# Altium PCB QSTL_QD4_2SET_38PAD.PcbDoc (part 1 of 2)
Units mm, origin at the board's own origin, x right, y up, seen from the top; angles counter-clockwise.
Board outline 32.6 x 99.03 mm, 6 copper layers (L1_GND, L2_DC_A, L3_DC_B, L4_GND, L5_GND, L6_RF_QD), stack 1.588 mm thick; 50 components, 71 nets, 241 pads, 1590 vias.
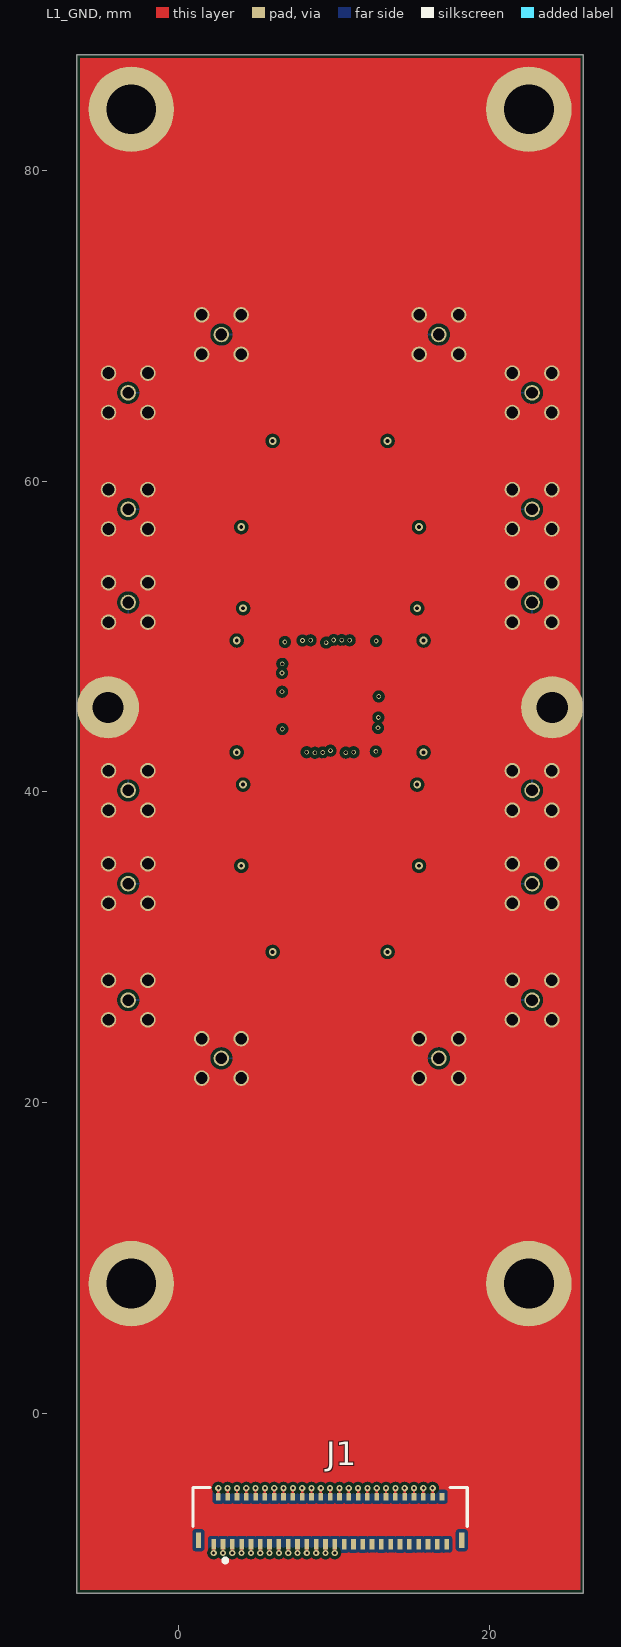
[diagram p0: L1_GND view]
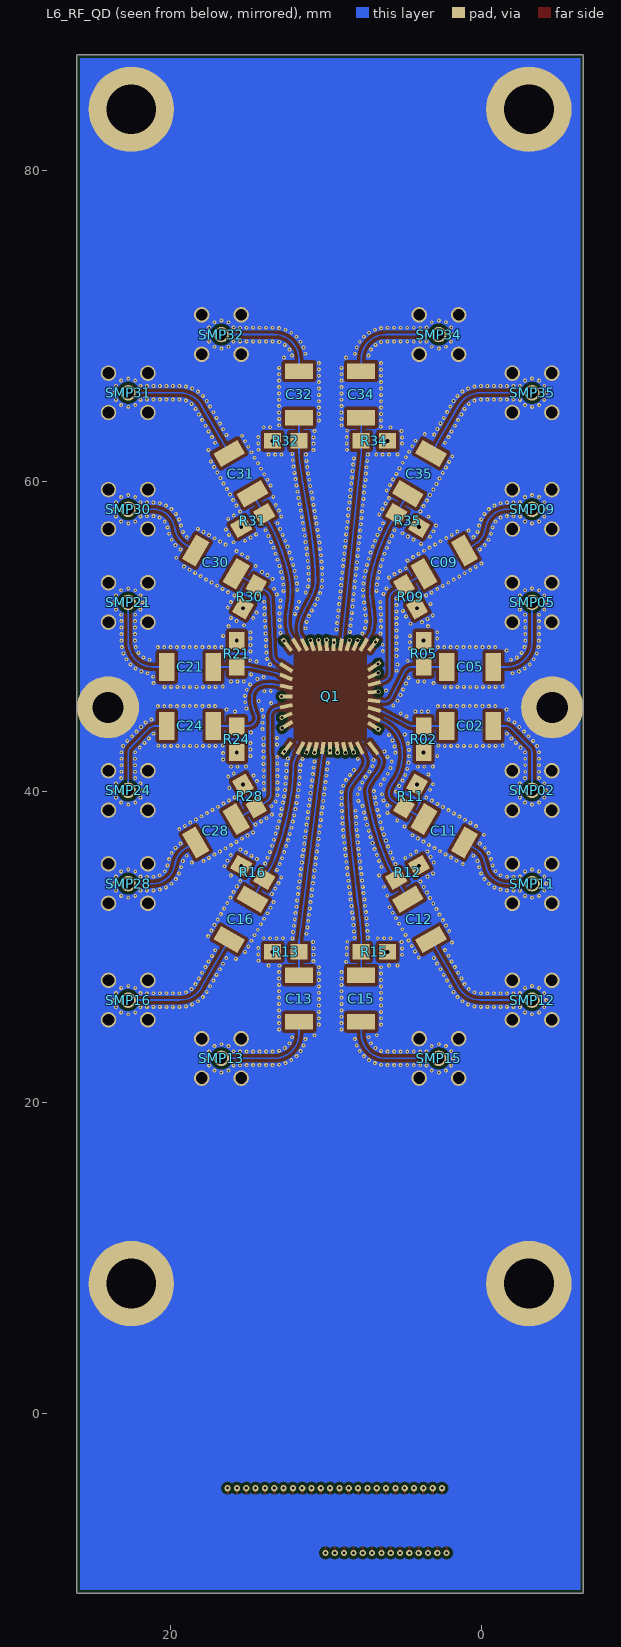
[diagram p1: L6_RF_QD view, seen from below]
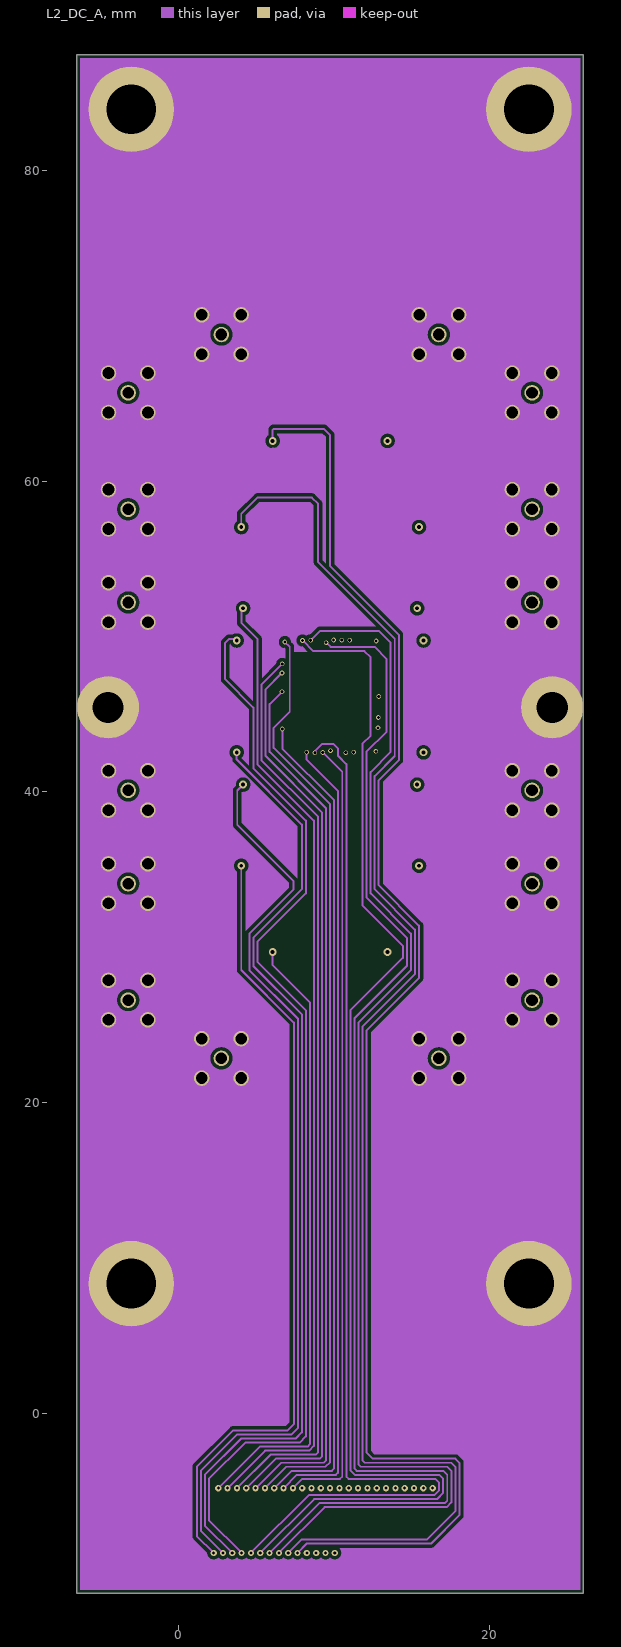
[diagram p2: L2_DC_A]
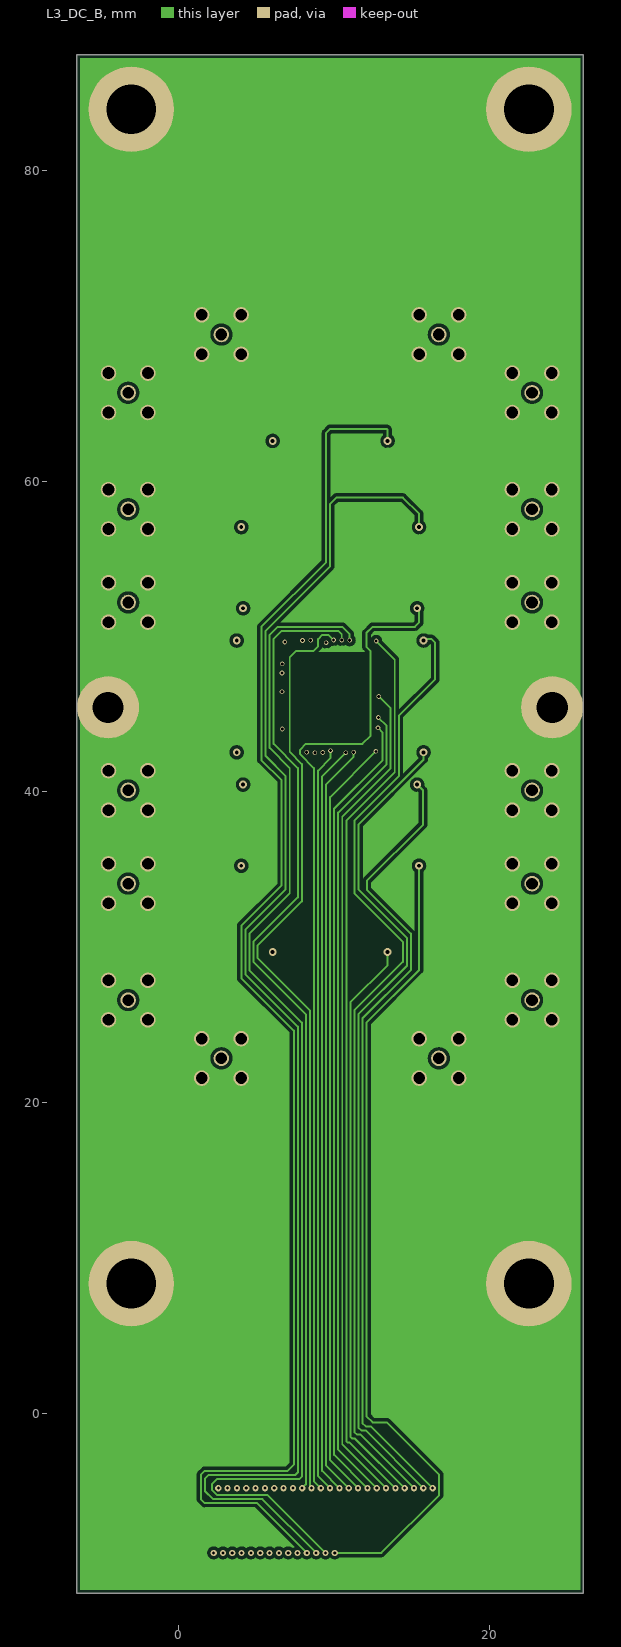
[diagram p3: L3_DC_B]
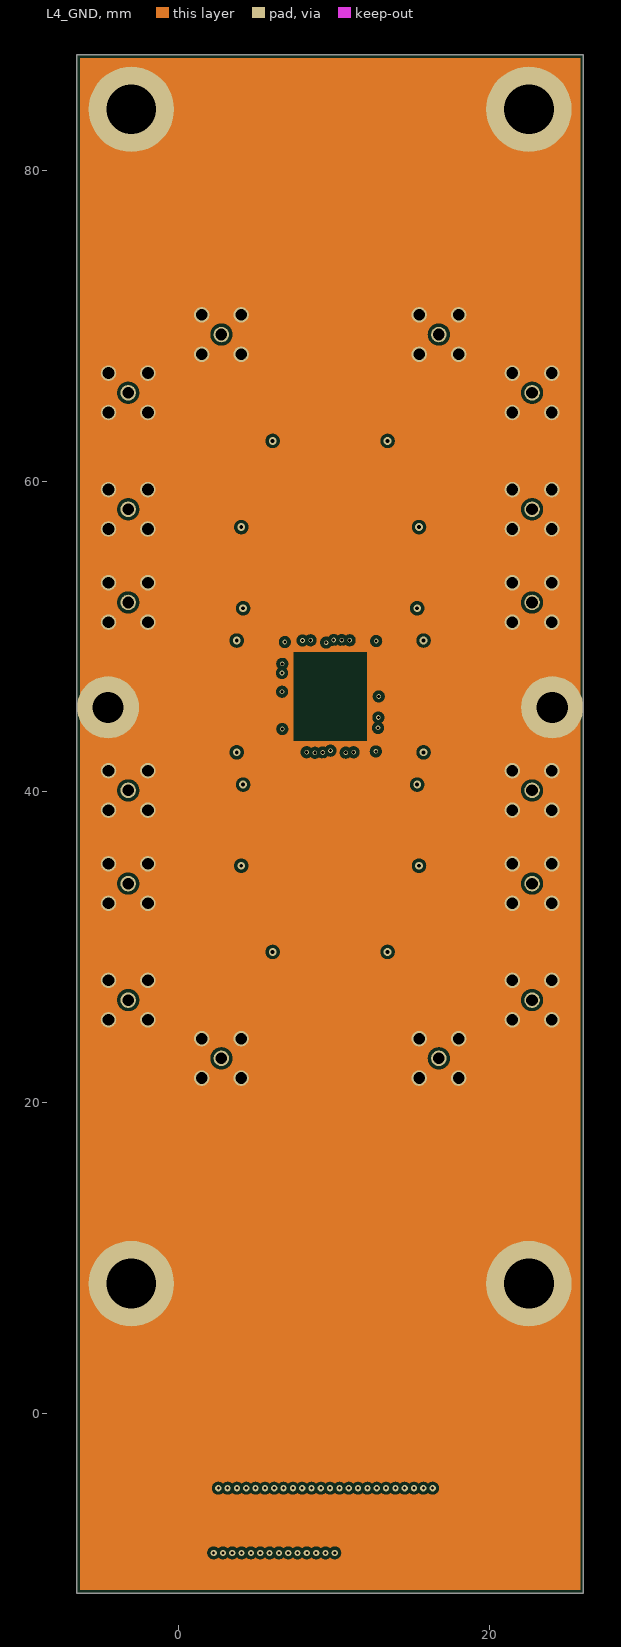
[diagram p4: L4_GND]
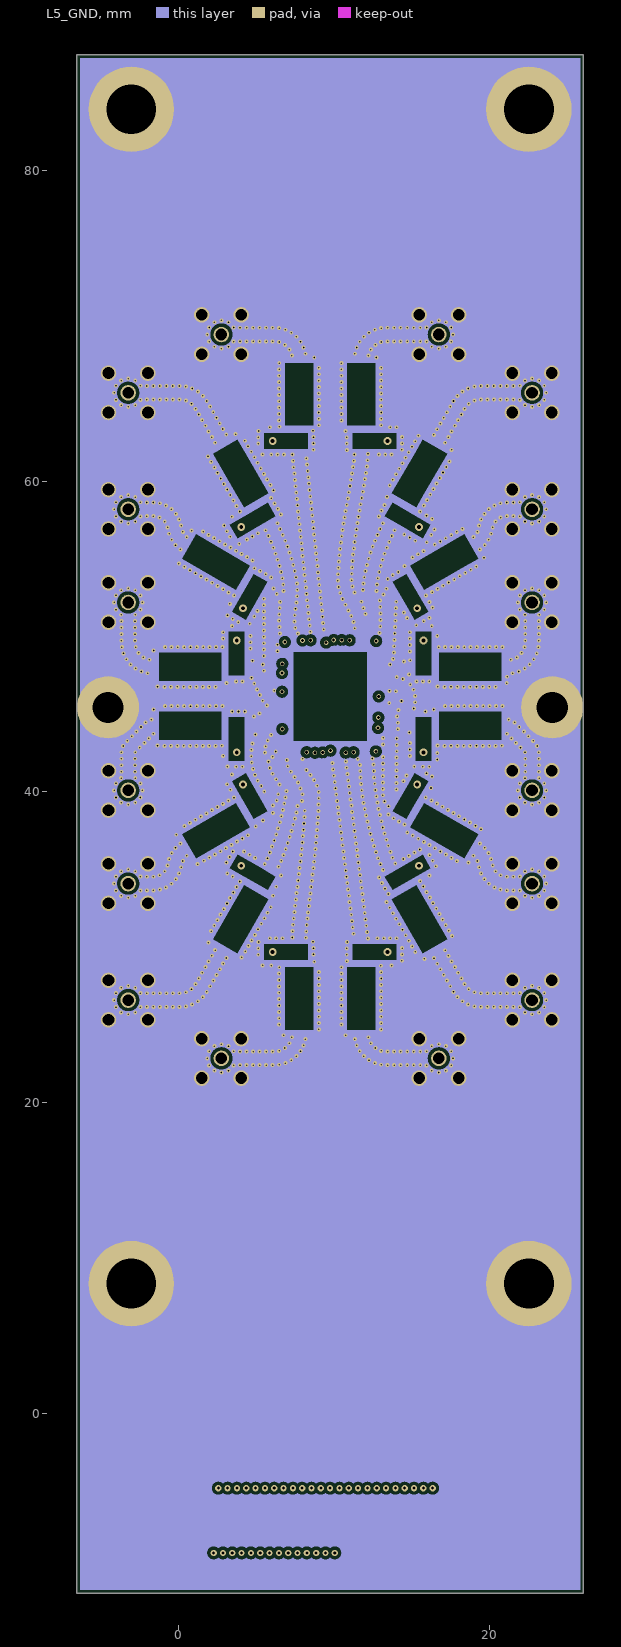
[diagram p5: L5_GND]
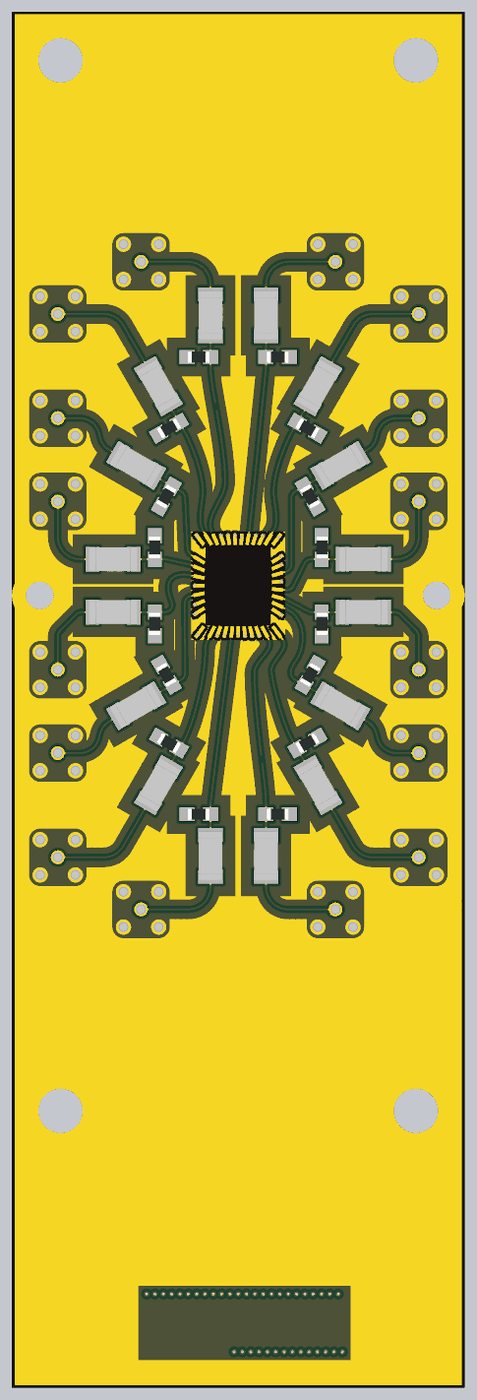
[diagram p7: 3D render of the assembled board from below, using the file's embedded part models]

## Layer stack, top to bottom
Top Solder: solder mask 0.0102, Solder Resist, Dk 3.5
L1_GND: signal copper 0.035
Dielectric 1: dielectric 0.0784, 1078RC69%, Dk 4.8
L2_DC_A: signal copper 0.0152
Dielectric2: dielectric 0.55, 0.55mm H/HOZ CORE, Dk 4.8
L3_DC_B: signal copper 0.0152
Dielectric3: dielectric 0.2008, 7628RC50%, Dk 4.8
L4_GND: signal copper 0.0152
Dielectric4: dielectric 0.55, 0.55mm H/HOZ CORE, Dk 4.8
L5_GND: signal copper 0.0152
Dielectric5: dielectric 0.0784, 1078RC69%, Dk 4.8
L6_RF_QD: signal copper 0.035
Bottom Solder: solder mask 0.0102, Solder Resist, Dk 3.5

## Board outline
-6.55,-11.575 26.05,-11.575 26.05,87.45 -6.55,87.45

## Design rules (kind name [scope] priority, off if disabled: settings)
Clearance QD38_DC_PAIR_GAP_0P1 [(InNet('DC01') Or InNet('DC02') Or InNet('DC03') Or InNet('DC04') Or InNet('DC05') Or InNet('DC06') Or InNet('DC07') Or InNet('DC08') Or InNet('DC09') Or InNet('DC10') Or InNet('DC11') Or InNet('DC12') Or InNet('DC13') Or InNet('DC14') Or InNet('DC15') Or InNet('DC16') Or InNet('DC17') Or InNet('DC18') Or InNet('DC19') Or InNet('DC20') Or InNet('DC21') Or InNet('DC22') Or InNet('DC23') Or InNet('DC24') Or InNet('DC25') Or InNet('DC26') Or InNet('DC27') Or InNet('DC28') Or InNet('DC29') Or InNet('DC30') Or InNet('DC31') Or InNet('DC32') Or InNet('DC33') Or InNet('DC34') Or InNet('DC35') Or InNet('DC36') Or InNet('DC37') Or InNet('DC38')) And (ExistsOnLayer('L2_DC_A') Or ExistsOnLayer('L3_DC_B')) vs (InNet('DC01') Or InNet('DC02') Or InNet('DC03') Or InNet('DC04') Or InNet('DC05') Or InNet('DC06') Or InNet('DC07') Or InNet('DC08') Or InNet('DC09') Or InNet('DC10') Or InNet('DC11') Or InNet('DC12') Or InNet('DC13') Or InNet('DC14') Or InNet('DC15') Or InNet('DC16') Or InNet('DC17') Or InNet('DC18') Or InNet('DC19') Or InNet('DC20') Or InNet('DC21') Or InNet('DC22') Or InNet('DC23') Or InNet('DC24') Or InNet('DC25') Or InNet('DC26') Or InNet('DC27') Or InNet('DC28') Or InNet('DC29') Or InNet('DC30') Or InNet('DC31') Or InNet('DC32') Or InNet('DC33') Or InNet('DC34') Or InNet('DC35') Or InNet('DC36') Or InNet('DC37') Or InNet('DC38')) And (ExistsOnLayer('L2_DC_A') Or ExistsOnLayer('L3_DC_B'))] p1: gap=0.1 ignorepadtopadclearanceinfootprint=FALSE
Clearance DC_GND_GAP_0P2 [InNet('GND') And (ExistsOnLayer('L2_DC_A') Or ExistsOnLayer('L3_DC_B')) vs (InNet('DC01') Or InNet('DC02') Or InNet('DC03') Or InNet('DC04') Or InNet('DC05') Or InNet('DC06') Or InNet('DC07') Or InNet('DC08') Or InNet('DC09') Or InNet('DC10') Or InNet('DC11') Or InNet('DC12') Or InNet('DC13') Or InNet('DC14') Or InNet('DC15') Or InNet('DC16') Or InNet('DC17') Or InNet('DC18') Or InNet('DC19') Or InNet('DC20') Or InNet('DC21') Or InNet('DC22') Or InNet('DC23') Or InNet('DC24') Or InNet('DC25') Or InNet('DC26') Or InNet('DC27') Or InNet('DC28') Or InNet('DC29') Or InNet('DC30') Or InNet('DC31') Or InNet('DC32') Or InNet('DC33') Or InNet('DC34') Or InNet('DC35') Or InNet('DC36') Or InNet('DC37') Or InNet('DC38')) And (ExistsOnLayer('L2_DC_A') Or ExistsOnLayer('L3_DC_B'))] p2: gap=0.2 ignorepadtopadclearanceinfootprint=FALSE // L2 and L4 GND pour clearance to signal copper: 0.20 mm.
Clearance RF_CPW_GND_GAP_0P2 [InNet('GND') And OnLayer('L6_RF_QD')] p3: gap=0.2 ignorepadtopadclearanceinfootprint=FALSE
Clearance [Not (InNet('GND') And OnLayer('L6_RF_QD')) And Not (InNet('GND') And (OnLayer('L2_DC_A') Or OnLayer('L3_DC_B'))) vs Not (InNet('GND') And OnLayer('L6_RF_QD')) And Not (InNet('GND') And (OnLayer('L2_DC_A') Or OnLayer('L3_DC_B')))] p4: gap=0.15 ignorepadtopadclearanceinfootprint=FALSE
HoleSize [All] p1: absolutevalues=TRUE maxlimit=4.1 minlimit=0.025 maxpercent=80.000 minpercent=20.000
MinimumSolderMaskSliver [All] p1: minsoldermaskwidth=0.1
PolygonConnect ZIF24V2_GND_VIA_SOLID [(IsVia Or (IsPad And Not InComponent('*'))) And InNet('GND')] p1: connectstyle=Direct reliefconductorwidth=0.254 reliefentries=4 polygonreliefangle="90 Angle" airgapwidth=0.254 // Solid GND shield vias and free mounting pads; component pads retain their rules.
PolygonConnect [All] p2: connectstyle=Relief reliefconductorwidth=0.254 reliefentries=4 polygonreliefangle="90 Angle" airgapwidth=0.254
RoutingLayers [All] p1: top layer_v5=TRUE mid layer 1_v5=TRUE mid layer 2_v5=TRUE mid layer 3_v5=FALSE mid layer 4_v5=FALSE bottom layer_v5=TRUE // RF on Bottom; DC on L2/L3 with short Top ZIF pad escapes. L1/L4/L5 GND.
RoutingVias QD38_QD_VIA_0P4_0P2 [IsVia And (InNet('DC01') Or InNet('DC03') Or InNet('DC04') Or InNet('DC06') Or InNet('DC07') Or InNet('DC08') Or InNet('DC10') Or InNet('DC14') Or InNet('DC17') Or InNet('DC18') Or InNet('DC19') Or InNet('DC20') Or InNet('DC22') Or InNet('DC23') Or InNet('DC25') Or InNet('DC26') Or InNet('DC27') Or InNet('DC29') Or InNet('DC33') Or InNet('DC36') Or InNet('DC37') Or InNet('DC38')) And InRegionAbsolute(251.927525197,1664.295451969,516.889710236,1969.719415748)] p1: holewidth=0.2 width=0.3 viastyle="Through Hole" minholewidth=0.2 minwidth=0.3 maxholewidth=0.2 maxwidth=0.3
RoutingVias QD38_ZIF_VIA_0P4_0P2 [IsVia And (InNet('DC01') Or InNet('DC02') Or InNet('DC03') Or InNet('DC04') Or InNet('DC05') Or InNet('DC06') Or InNet('DC07') Or InNet('DC08') Or InNet('DC09') Or InNet('DC10') Or InNet('DC11') Or InNet('DC12') Or InNet('DC13') Or InNet('DC14') Or InNet('DC15') Or InNet('DC16') Or InNet('DC17') Or InNet('DC18') Or InNet('DC19') Or InNet('DC20') Or InNet('DC21') Or InNet('DC22') Or InNet('DC23') Or InNet('DC24') Or InNet('DC25') Or InNet('DC26') Or InNet('DC27') Or InNet('DC28') Or InNet('DC29') Or InNet('DC30') Or InNet('DC31') Or InNet('DC32') Or InNet('DC33') Or InNet('DC34') Or InNet('DC35') Or InNet('DC36') Or InNet('DC37') Or InNet('DC38')) And InRegionAbsolute(78.740080315,-363.779481102,653.543219685,-180.118141732)] p2: holewidth=0.2 width=0.4 viastyle="Through Hole" minholewidth=0.2 minwidth=0.4 maxholewidth=0.2 maxwidth=0.4
RoutingVias RF_SHIELD_L5_L6 [IsVia And InNet('GND')] p3: holewidth=0.1 width=0.25 viastyle="Blind Buried (Adjacent Layers)" minholewidth=0.1 minwidth=0.25 maxholewidth=0.1 maxwidth=0.25
RoutingVias [Not (IsVia And InNet('GND')) And Not (IsVia And (InNet('DC01') Or InNet('DC02') Or InNet('DC03') Or InNet('DC04') Or InNet('DC05') Or InNet('DC06') Or InNet('DC07') Or InNet('DC08') Or InNet('DC09') Or InNet('DC10') Or InNet('DC11') Or InNet('DC12') Or InNet('DC13') Or InNet('DC14') Or InNet('DC15') Or InNet('DC16') Or InNet('DC17') Or InNet('DC18') Or InNet('DC19') Or InNet('DC20') Or InNet('DC21') Or InNet('DC22') Or InNet('DC23') Or InNet('DC24') Or InNet('DC25') Or InNet('DC26') Or InNet('DC27') Or InNet('DC28') Or InNet('DC29') Or InNet('DC30') Or InNet('DC31') Or InNet('DC32') Or InNet('DC33') Or InNet('DC34') Or InNet('DC35') Or InNet('DC36') Or InNet('DC37') Or InNet('DC38')) And InRegionAbsolute(78.740080315,-363.779481102,653.543219685,-180.118141732)) And Not (IsVia And (InNet('DC01') Or InNet('DC03') Or InNet('DC04') Or InNet('DC06') Or InNet('DC07') Or InNet('DC08') Or InNet('DC10') Or InNet('DC14') Or InNet('DC17') Or InNet('DC18') Or InNet('DC19') Or InNet('DC20') Or InNet('DC22') Or InNet('DC23') Or InNet('DC25') Or InNet('DC26') Or InNet('DC27') Or InNet('DC29') Or InNet('DC33') Or InNet('DC36') Or InNet('DC37') Or InNet('DC38')) And InRegionAbsolute(251.927525197,1664.295451969,516.889710236,1969.719415748))] p4: holewidth=0.25 width=0.5 viastyle="Through Hole" minholewidth=0.25 minwidth=0.5 maxholewidth=0.25 maxwidth=0.5
SilkToSolderMaskClearance [IsPad] p1: minsilkscreentomaskgap=0.15 clearancetoexposedcopper=TRUE
SolderMaskExpansion [All] p1: expansion=0.05 istentingtop=FALSE
Width QD38_DC_WIDTH [(InNet('DC01') Or InNet('DC02') Or InNet('DC03') Or InNet('DC04') Or InNet('DC05') Or InNet('DC06') Or InNet('DC07') Or InNet('DC08') Or InNet('DC09') Or InNet('DC10') Or InNet('DC11') Or InNet('DC12') Or InNet('DC13') Or InNet('DC14') Or InNet('DC15') Or InNet('DC16') Or InNet('DC17') Or InNet('DC18') Or InNet('DC19') Or InNet('DC20') Or InNet('DC21') Or InNet('DC22') Or InNet('DC23') Or InNet('DC24') Or InNet('DC25') Or InNet('DC26') Or InNet('DC27') Or InNet('DC28') Or InNet('DC29') Or InNet('DC30') Or InNet('DC31') Or InNet('DC32') Or InNet('DC33') Or InNet('DC34') Or InNet('DC35') Or InNet('DC36') Or InNet('DC37') Or InNet('DC38'))] p1: maxlimit=0.254 minlimit=0.125 preferedwidth=0.125 toplayer_minwidth=0.15 toplayer_maxwidth=0.15 toplayer_prefwidth=0.15 midlayer1_maxwidth=0.125 midlayer2_maxwidth=0.125 midlayer3_maxwidth=0.125 midlayer4_minwidth=0.254 midlayer4_prefwidth=0.254 bottomlayer_maxwidth=0.125 minimp=50.000000 maximp=50.000000 favimp=50.000000
Width RF_50OHM_WIDTH [OnLayer('L6_RF_QD') And (InNet('MW02') Or InNet('MW05') Or InNet('MW09') Or InNet('MW11') Or InNet('MW12') Or InNet('MW13') Or InNet('MW15') Or InNet('MW16') Or InNet('MW21') Or InNet('MW24') Or InNet('MW28') Or InNet('MW30') Or InNet('MW31') Or InNet('MW32') Or InNet('MW34') Or InNet('MW35') Or InNet('S02') Or InNet('S05') Or InNet('S09') Or InNet('S11') Or InNet('S12') Or InNet('S13') Or InNet('S15') Or InNet('S16') Or InNet('S21') Or InNet('S24') Or InNet('S28') Or InNet('S30') Or InNet('S31') Or InNet('S32') Or InNet('S34') Or InNet('S35'))] p2: maxlimit=0.11 minlimit=0.11 preferedwidth=0.11
Width [Not (OnLayer('L6_RF_QD') And (InNet('MW02') Or InNet('MW05') Or InNet('MW09') Or InNet('MW11') Or InNet('MW12') Or InNet('MW13') Or InNet('MW15') Or InNet('MW16') Or InNet('MW21') Or InNet('MW24') Or InNet('MW28') Or InNet('MW30') Or InNet('MW31') Or InNet('MW32') Or InNet('MW34') Or InNet('MW35') Or InNet('S02') Or InNet('S05') Or InNet('S09') Or InNet('S11') Or InNet('S12') Or InNet('S13') Or InNet('S15') Or InNet('S16') Or InNet('S21') Or InNet('S24') Or InNet('S28') Or InNet('S30') Or InNet('S31') Or InNet('S32') Or InNet('S34') Or InNet('S35'))) And Not ((InNet('DC01') Or InNet('DC02') Or InNet('DC03') Or InNet('DC04') Or InNet('DC05') Or InNet('DC06') Or InNet('DC07') Or InNet('DC08') Or InNet('DC09') Or InNet('DC10') Or InNet('DC11') Or InNet('DC12') Or InNet('DC13') Or InNet('DC14') Or InNet('DC15') Or InNet('DC16') Or InNet('DC17') Or InNet('DC18') Or InNet('DC19') Or InNet('DC20') Or InNet('DC21') Or InNet('DC22') Or InNet('DC23') Or InNet('DC24') Or InNet('DC25') Or InNet('DC26') Or InNet('DC27') Or InNet('DC28') Or InNet('DC29') Or InNet('DC30') Or InNet('DC31') Or InNet('DC32') Or InNet('DC33') Or InNet('DC34') Or InNet('DC35') Or InNet('DC36') Or InNet('DC37') Or InNet('DC38')))] p3: maxlimit=0.254 minlimit=0.125 preferedwidth=0.15 minimp=50.000000 maximp=50.000000 favimp=50.000000
26 further rules are at their usual default settings.

## Components (designator, comment, footprint, x,y, rotation, side; value= is the part's Value field where it differs from the comment)
C02 "Comment" CAPC3216_CC1206JKNPO9BN104 0.735,44.25 r180 bottom
C05 "Comment" CAPC3216_CC1206JKNPO9BN104 0.735,48.05 r180 bottom
C09 "Comment" CAPC3216_CC1206JKNPO9BN104 2.4,54.8 r150 bottom
C11 "Comment" CAPC3216_CC1206JKNPO9BN104 2.4,37.5 r210 bottom
C12 "Comment" CAPC3216_CC1206JKNPO9BN104 4,31.8 r240 bottom
C13 "Comment" CAPC3216_CC1206JKNPO9BN104 11.75,26.7 r270 bottom
C15 "Comment" CAPC3216_CC1206JKNPO9BN104 7.75,26.7 r270 bottom
C16 "Comment" CAPC3216_CC1206JKNPO9BN104 15.5,31.8 r300 bottom
C21 "Comment" CAPC3216_CC1206JKNPO9BN104 18.765,48.05 r0 bottom
C24 "Comment" CAPC3216_CC1206JKNPO9BN104 18.765,44.25 r0 bottom
C28 "Comment" CAPC3216_CC1206JKNPO9BN104 17.1,37.5 r330 bottom
C30 "Comment" CAPC3216_CC1206JKNPO9BN104 17.1,54.8 r30 bottom
C31 "Comment" CAPC3216_CC1206JKNPO9BN104 15.5,60.5 r60 bottom
C32 "Comment" CAPC3216_CC1206JKNPO9BN104 11.75,65.6 r90 bottom
C34 "Comment" CAPC3216_CC1206JKNPO9BN104 7.75,65.6 r90 bottom
C35 "Comment" CAPC3216_CC1206JKNPO9BN104 4,60.5 r120 bottom
J1 "5025985193" FP-5025985193-MFG 9.75,-6.725 r0 top
Q1 "Comment" QD4_2SET_38 9.75,46.15 r90 bottom
R02 "Comment" CC1608-0603 3.735,43.4 r90 bottom
R05 "Comment" CC1608-0603 3.735,48.9 r270 bottom
R09 "Comment" CC1608-0603 4.573,52.564 r60 bottom
R11 "Comment" CC1608-0603 4.573,39.736 r300 bottom
R12 "Comment" CC1608-0603 4.764,34.823 r330 bottom
R13 "Comment" CC1608-0603 12.6,29.7 r180 bottom
R15 "Comment" CC1608-0603 6.9,29.7 r0 bottom
R16 "Comment" CC1608-0603 14.736,34.823 r210 bottom
R21 "Comment" CC1608-0603 15.765,48.9 r270 bottom
R24 "Comment" CC1608-0603 15.765,43.4 r90 bottom
R28 "Comment" CC1608-0603 14.927,39.736 r240 bottom
R30 "Comment" CC1608-0603 14.927,52.564 r120 bottom
R31 "Comment" CC1608-0603 14.736,57.477 r150 bottom
R32 "Comment" CC1608-0603 12.6,62.6 r180 bottom
R34 "Comment" CC1608-0603 6.9,62.6 r0 bottom
R35 "Comment" CC1608-0603 4.764,57.477 r30 bottom
SMP02 "Comment" RF_Con -3.25,40.1 r0 bottom
SMP05 "Comment" RF_Con -3.25,52.2 r0 bottom
SMP09 "Comment" RF_Con -3.25,58.2 r0 bottom
SMP11 "Comment" RF_Con -3.25,34.1 r0 bottom
SMP12 "Comment" RF_Con -3.25,26.6 r0 bottom
SMP13 "Comment" RF_Con 16.75,22.85 r0 bottom
SMP15 "Comment" RF_Con 2.75,22.85 r0 bottom
SMP16 "Comment" RF_Con 22.75,26.6 r0 bottom
SMP21 "Comment" RF_Con 22.75,52.2 r0 bottom
SMP24 "Comment" RF_Con 22.75,40.1 r0 bottom
SMP28 "Comment" RF_Con 22.75,34.1 r0 bottom
SMP30 "Comment" RF_Con 22.75,58.2 r0 bottom
SMP31 "Comment" RF_Con 22.75,65.7 r0 bottom
SMP32 "Comment" RF_Con 16.75,69.45 r0 bottom
SMP34 "Comment" RF_Con 2.75,69.45 r0 bottom
SMP35 "Comment" RF_Con -3.25,65.7 r0 bottom

## Footprints (in the part's own frame and the unit in brackets; to place one, negate y for a bottom-side part, rotate by r counter-clockwise, add the part's x,y. Pads: shape width x height; smd on the part's side, far side on the other; paste and mask are expansions set on the pad)
CAPC3216_CC1206JKNPO9BN104 [mm]
  rect 1x1.8 smd paste+0 mask+0.05: 1(1.5,0) 2(-1.5,0)
  body extent -1.75,-0.9 1.75,0.9, height 1.8
CC1608-0603 [mm]
  rect 1.1x1 smd paste+0 mask+0.05: 1(0.85,0) 2(-0.85,0)
  body extent -0.8,-0.4 0.8,0.4, height 0.45
FP-5025985193-MFG [mm]
  rect 0.3x0.67 smd paste+0 mask+0: 1(-7.5,-1.715) 3(-6.9,-1.715) 5(-6.3,-1.715) 7(-5.7,-1.715) 9(-5.1,-1.715) 11(-4.5,-1.715) 13(-3.9,-1.715) 15(-3.3,-1.715) 17(-2.7,-1.715) 19(-2.1,-1.715) 21(-1.5,-1.715) 23(-0.9,-1.715) 25(-0.3,-1.715) 27(0.3,-1.715) 29(0.9,-1.715) 31(1.5,-1.715) 33(2.1,-1.715) 35(2.7,-1.715) 37(3.3,-1.715) 39(3.9,-1.715) 41(4.5,-1.715) 43(5.1,-1.715) 45(5.7,-1.715) 47(6.3,-1.715) 49(6.9,-1.715) 51(7.5,-1.715)
  rect 0.3x0.5 smd paste+0 mask+0: 2(-7.2,1.35) 4(-6.6,1.35) 6(-6,1.35) 8(-5.4,1.35) 10(-4.8,1.35) 12(-4.2,1.35) 14(-3.6,1.35) 16(-3,1.35) 18(-2.4,1.35) 20(-1.8,1.35) 22(-1.2,1.35) 24(-0.6,1.35) 26(0,1.35) 28(0.6,1.35) 30(1.2,1.35) 32(1.8,1.35) 34(2.4,1.35) 36(3,1.35) 38(3.6,1.35) 40(4.2,1.35) 42(4.8,1.35) 44(5.4,1.35) 46(6,1.35) 48(6.6,1.35) 50(7.2,1.35)
  rect 0.35x1 smd paste+0 mask+0: 52(-8.475,-1.45) 53(8.475,-1.45)
  silkscreen extent -8.83,-2.87 8.82,1.95, body extent -8.7,-2.23 8.7,1.57, height 1.26
QD4_2SET_38 [mm]
  rect 0.802x0.26 smd rot 176.38 paste-2539.97 mask+0.05: 1(3.33,-0.233)
  rect 0.814x0.26 smd rot 169.35 paste-2539.97 mask+0.05: 2(3.33,-0.696)
  rect 0.839x0.26 smd rot 162.43 paste-2539.97 mask+0.05: 3(3.33,-1.167)
  rect 0.878x0.26 smd rot 155.67 paste-2539.97 mask+0.05: 4(3.33,-1.654)
  rect 0.932x0.26 smd rot 149.13 paste-2539.97 mask+0.05: 5(3.33,-2.164)
  rect 1.005x0.26 smd rot 142.74 paste-2539.97 mask+0.05: 6(3.33,-2.783) 25(-3.33,2.783)
  rect 0.955x0.26 smd rot 123.11 paste-2539.97 mask+0.05: 7(1.936,-2.83)
  rect 0.883x0.26 smd rot 114.98 paste-2539.97 mask+0.05: 8(1.383,-2.83)
  rect 0.831x0.26 smd rot 105.61 paste-2539.97 mask+0.05: 9(0.83,-2.83)
  rect 0.803x0.26 smd rot 95.32 paste-2539.97 mask+0.05: 10(0.277,-2.83)
  rect 0.803x0.26 smd rot 84.68 paste-2539.97 mask+0.05: 11(-0.277,-2.83)
  rect 0.831x0.26 smd rot 74.39 paste-2539.97 mask+0.05: 12(-0.83,-2.83)
  rect 0.883x0.26 smd rot 65.02 paste-2539.97 mask+0.05: 13(-1.383,-2.83)
  rect 0.955x0.26 smd rot 56.89 paste-2539.97 mask+0.05: 14(-1.936,-2.83)
  rect 1.005x0.26 smd rot 37.26 paste-2539.97 mask+0.05: 15(-3.33,-2.783) 33(3.33,2.783)
  rect 0.903x0.26 smd rot 27.67 paste-2539.97 mask+0.05: 16(-3.33,-1.908)
  rect 0.857x0.26 smd rot 21.01 paste-2539.97 mask+0.05: 17(-3.33,-1.41)
  rect 0.825x0.26 smd rot 14.14 paste-2539.97 mask+0.05: 18(-3.33,-0.931)
  rect 0.806x0.26 smd rot 7.14 paste-2539.97 mask+0.05: 19(-3.33,-0.464)
  rect 0.8x0.26 smd paste-2539.97 mask+0.05: 20(-3.33,0)
  rect 0.806x0.26 smd rot 172.86 paste-2539.97 mask+0.05: 21(-3.33,0.464)
  rect 0.825x0.26 smd rot 165.86 paste-2539.97 mask+0.05: 22(-3.33,0.931)
  rect 0.857x0.26 smd rot 158.99 paste-2539.97 mask+0.05: 23(-3.33,1.41)
  rect 0.903x0.26 smd rot 152.33 paste-2539.97 mask+0.05: 24(-3.33,1.908)
  rect 0.945x0.26 smd rot 122.16 paste-2539.97 mask+0.05: 26(-1.867,2.83)
  rect 0.867x0.26 smd rot 112.74 paste-2539.97 mask+0.05: 27(-1.244,2.83)
  rect 0.817x0.26 smd rot 101.84 paste-2539.97 mask+0.05: 28(-0.622,2.83)
  rect 0.26x0.8 smd paste-2539.97 mask+0.05: 29(0,2.83)
  rect 0.817x0.26 smd rot 78.16 paste-2539.97 mask+0.05: 30(0.622,2.83)
  rect 0.867x0.26 smd rot 67.26 paste-2539.97 mask+0.05: 31(1.244,2.83)
  rect 0.945x0.26 smd rot 57.84 paste-2539.97 mask+0.05: 32(1.867,2.83)
  rect 0.932x0.26 smd rot 30.87 paste-2539.97 mask+0.05: 34(3.33,2.164)
  rect 0.878x0.26 smd rot 24.33 paste-2539.97 mask+0.05: 35(3.33,1.654)
  rect 0.839x0.26 smd rot 17.57 paste-2539.97 mask+0.05: 36(3.33,1.167)
  rect 0.814x0.26 smd rot 10.65 paste-2539.97 mask+0.05: 37(3.33,0.696)
  rect 0.802x0.26 smd rot 3.62 paste-2539.97 mask+0.05: 38(3.33,0.233)
RF_Con [mm]
  round 1 hole 0.75 paste-2539.97 mask+0.05: 1(0,0) 2(-1.27,-1.27) 3(-1.27,1.27) 4(1.27,1.27) 5(1.27,-1.27)
  body extent -2.75,-2.74 2.75,2.74, height 5.4

## Part data
J1: library part ZIF_5025985193_53, "CONN FPC 51POS 0.30MM R/A"

## Free pads (board coordinates)
  round 4 hole 2 paste-2539.97 mask+0.05: A3(24.05,45.45) A4(-4.55,45.45)
  round 5.5 hole 3.2 paste-2539.97 mask+0.05: P1(22.55,8.35) P2(-3.05,8.35) P3(22.55,83.95) P4(-3.05,83.95)

## Via types
v1: diameter 0.25, hole 0.1, L5_GND to L6_RF_QD, 1514 vias
v2: diameter 0.4, hole 0.2, L1_GND to L6_RF_QD, 38 vias
v3: diameter 0.3, hole 0.2, L1_GND to L6_RF_QD, 22 vias
v4: diameter 0.5, hole 0.25, L1_GND to L6_RF_QD, 16 vias

## Nets (pads, with @x,y where several pads share a name; then routed paths per layer and width w, separated by ;. In a path a pad name is that pad's centre, name@x,y a point inside that pad or via, vN(x,y) a via of type N, cw(c..) or ccw(c..) an arc to the next point about the centre after c; other vN are vias at no path point)
DC01: J1.13 Q1.1 | length 80.7
  L1_GND w0.15: v2(5.85,-8.99) J1.13@5.85,-8.44
  L2_DC_A w0.125: v2(5.85,-8.99) 9.055,-5.785 17.14,-5.785 17.29,-5.635 17.29,-3.965 17.03,-3.705 11.46,-3.705 11.31,-3.555 11.31,25.415 14.69,28.795 14.69,30.615 12.09,33.215 12.09,42.575 13.39,43.875 13.39,48.555 12.61,49.335 9.777,49.335 v3(9.496,49.616)
DC02: J1.19 R34.2 | length 96.6
  L1_GND w0.15: v2(7.65,-8.99) J1.19@7.65,-8.44
  L2_DC_A w0.125: v4(6.05,62.6) 6.05,63.315 6.11,63.375 9.35,63.375 9.75,62.975 9.75,54.535 14.17,50.115 14.17,42.055 12.87,40.755 12.87,33.995 15.47,31.395 15.47,28.015 12.09,24.635 12.09,-2.525 12.49,-2.925 17.81,-2.925 18.07,-3.185 18.07,-6.565 16.25,-8.385 8.255,-8.385 v2(7.65,-8.99)
DC03: J1.15 Q1.3 | length 82.8
  L1_GND w0.15: v2(6.45,-8.99) J1.15@6.45,-8.44
  L2_DC_A w0.125: v2(6.45,-8.99) 9.395,-6.045 17.25,-6.045 17.55,-5.745 17.55,-3.705 17.29,-3.445 11.72,-3.445 11.57,-3.295 11.57,25.155 14.95,28.535 14.95,30.875 12.35,33.475 12.35,41.275 13.65,42.575 13.65,49.595 12.87,50.375 9.102,50.375 v3(8.492,49.766)
DC04: J1.11 Q1.4 | length 80.9
  L1_GND w0.15: v2(5.25,-8.99) J1.11@5.25,-8.44
  L2_DC_A w0.125: v2(5.25,-8.99) 8.715,-5.525 16.63,-5.525 17.03,-5.125 17.03,-4.225 16.77,-3.965 11.35,-3.965 11.05,-3.665 11.05,25.935 14.43,29.315 14.43,30.095 11.83,32.695 11.83,43.095 12.35,43.615 12.35,48.675 11.95,49.075 8.65,49.075 v3(7.972,49.753)
DC05: J1.17 R35.2 | length 94.5
  L1_GND w0.15: v2(7.05,-8.99) J1.17@7.05,-8.44
  L2_DC_A w0.125: v4(4.028,57.052) 4.028,57.913 5.07,58.955 8.57,58.955 8.97,58.555 8.97,54.795 13.91,49.855 13.91,42.315 12.61,41.015 12.61,33.735 15.21,31.135 15.21,28.275 11.83,24.895 11.83,-3.035 11.98,-3.185 17.55,-3.185 17.81,-3.445 17.81,-6.305 15.99,-8.125 7.915,-8.125 v2(7.05,-8.99)
DC06: J1.12 Q1.6 | length 60.3
  L1_GND w0.15: J1.12@5.55,-5.375 v2(5.55,-4.825)
  L2_DC_A w0.125: v2(5.55,-4.825) 6.93,-3.445 9.45,-3.445 9.75,-3.145 9.75,39.195 6.11,42.835 6.11,44.135 7.15,45.175 7.15,49.339 v3(6.835,49.654)
DC07: J1.6 Q1.7 | length 59.6
  L1_GND w0.15: J1.6@3.75,-5.375 v2(3.75,-4.825)
  L2_DC_A w0.125: v2(3.75,-4.825) 5.91,-2.665 8.82,-2.665 8.97,-2.515 8.97,38.415 5.33,42.055 5.33,46.91 v3(6.67,48.249)
DC08: J1.8 Q1.8 | length 58.7
  L1_GND w0.15: J1.8@4.35,-5.375 v2(4.35,-4.825)
  L2_DC_A w0.125: v2(4.35,-4.825) 6.25,-2.925 9.08,-2.925 9.23,-2.775 9.23,38.675 5.59,42.315 5.59,46.6 v3(6.649,47.659)
DC09: J1.4 R09.2 | length 63.2
  L1_GND w0.15: J1.4@3.15,-5.375 v2(3.15,-4.825)
  L2_DC_A w0.125: v2(3.15,-4.825) 5.57,-2.405 8.41,-2.405 8.71,-2.105 8.71,38.155 5.07,41.795 5.07,49.855 4.03,50.895 4.03,51.71 v4(4.148,51.828)
DC10: J1.10 Q1.10 | length 57.2
  L1_GND w0.15: J1.10@4.95,-5.375 v2(4.95,-4.825)
  L2_DC_A w0.125: v2(4.95,-4.825) 6.59,-3.185 9.34,-3.185 9.49,-3.035 9.49,38.935 5.85,42.575 5.85,45.649 v3(6.652,46.451)
DC11: J1.7 R05.2 | length 70.3
  L1_GND w0.15: v2(4.05,-8.99) J1.7@4.05,-8.44
  L2_DC_A w0.125: v4(3.735,49.75) 3.63,49.855 3.246,49.855 2.99,49.599 2.99,47.255 4.81,45.435 4.81,41.535 8.19,38.155 8.19,33.475 5.07,30.355 5.07,29.055 8.19,25.935 8.19,-1.485 7.79,-1.885 4.29,-1.885 1.95,-4.225 1.95,-6.89 v2(4.05,-8.99)
DC12: J1.5 R02.2 | length 61.8
  L1_GND w0.15: v2(3.45,-8.99) J1.5@3.45,-8.44
  L2_DC_A w0.125: v2(3.45,-8.99) 1.69,-7.23 1.69,-3.965 4.03,-1.625 7.53,-1.625 7.93,-1.225 7.93,25.675 4.81,28.795 4.81,30.615 7.93,33.735 7.93,37.895 3.735,42.09 v4(3.735,42.55)
DC13: J1.3 R11.2 | length 59.4
  L1_GND w0.15: v2(2.85,-8.99) J1.3@2.85,-8.44
  L2_DC_A w0.125: v2(2.85,-8.99) 1.43,-7.57 1.43,-3.705 3.77,-1.365 7.27,-1.365 7.67,-0.965 7.67,25.415 4.55,28.535 4.55,30.875 7.387,33.712 7.387,34.278 3.77,37.895 3.77,40.094 v4(4.148,40.472)
DC14: J1.14 Q1.14 | length 53.9
  L1_GND w0.15: J1.14@6.15,-5.375 v2(6.15,-4.825)
  L2_DC_A w0.125: v2(6.15,-4.825) 7.27,-3.705 9.86,-3.705 10.01,-3.555 10.01,39.455 6.67,42.795 v3(6.67,44.051)
DC15: J1.1 R12.2 | length 51.3
  L1_GND w0.15: v2(2.25,-8.99) J1.1@2.25,-8.44
  L2_DC_A w0.125: v2(2.25,-8.99) 1.17,-7.91 1.17,-3.445 3.51,-1.105 7.01,-1.105 7.41,-0.705 7.41,25.155 4.028,28.537 v4(4.028,35.248)
DC16: J1.2 R15.2 | length 40.3
  L1_GND w0.15: J1.2@2.55,-5.375 v2(2.55,-4.825)
  L2_DC_A w0.125: v2(2.55,-4.825) 5.23,-2.145 8.3,-2.145 8.45,-1.995 8.45,26.455 6.05,28.855 v4(6.05,29.7)
DC17: J1.16 Q1.17 | length 51.7
  L1_GND w0.15: J1.16@6.75,-5.375 v2(6.75,-4.825)
  L2_DC_A w0.125: v2(6.75,-4.825) 7.61,-3.965 10.12,-3.965 10.27,-3.815 10.27,40.042 8.239,42.074 v3(8.239,42.556)
DC18: J1.9 Q1.18 | length 70
  L1_GND w0.15: v2(4.65,-8.99) J1.9@4.65,-8.44
  L2_DC_A w0.125: v2(4.65,-8.99) 8.375,-5.265 16.458,-5.265 16.77,-4.953 16.77,-4.485 16.51,-4.225 10.94,-4.225 10.79,-4.075 10.79,41.795 10.27,42.315 10.27,42.783 9.958,43.095 9.23,43.095 8.77,42.635 v3(8.77,42.523)
DC19: J1.18 Q1.19 | length 51.2
  L1_GND w0.15: J1.18@7.35,-5.375 v2(7.35,-4.825)
  L2_DC_A w0.125: v2(7.35,-4.825) 7.95,-4.225 10.38,-4.225 10.53,-4.075 10.53,41.291 v3(9.277,42.544)
DC20: J1.26 Q1.20 | length 48.7
  L1_GND w0.15: J1.26@9.75,-5.375 v2(9.75,-4.825)
  L3_DC_B w0.125: v2(9.75,-4.825) 8.97,-4.045 8.97,41.377 9.77,42.177 v3(9.77,42.658)
DC21: J1.42 R13.2 | length 37.6
  L1_GND w0.15: J1.42@14.55,-5.375 v2(14.55,-4.825)
  L3_DC_B w0.125: v4(13.45,29.7) 13.45,28.855 11.05,26.455 11.05,-1.505 11.17,-1.625 11.35,-1.625 v2(14.55,-4.825)
DC22: J1.28 Q1.22 | length 49
  L1_GND w0.15: J1.28@10.35,-5.375 v2(10.35,-4.825)
  L3_DC_B w0.125: v2(10.35,-4.825) 9.23,-3.705 9.23,41.005 v3(10.754,42.529)
DC23: J1.30 Q1.23 | length 49.3
  L1_GND w0.15: J1.30@10.95,-5.375 v2(10.95,-4.825)
  L3_DC_B w0.125: v2(10.95,-4.825) 9.49,-3.365 9.49,40.495 11.261,42.266 v3(11.261,42.556)
DC24: J1.27 R16.2 | length 53.2
  L1_GND w0.15: v2(10.05,-8.99) J1.27@10.05,-8.44
  L3_DC_B w0.125: v2(10.05,-8.99) 13.045,-8.99 16.77,-5.265 16.77,-3.965 13.39,-0.585 12.49,-0.585 12.09,-0.185 12.09,25.155 15.472,28.537 v4(15.472,35.248)
DC25: J1.32 Q1.25 | length 50
  L1_GND w0.15: J1.32@11.55,-5.375 v2(11.55,-4.825)
  L3_DC_B w0.125: v2(11.55,-4.825) 9.75,-3.025 9.75,39.671 v3(12.691,42.612)
DC26: J1.34 Q1.26 | length 51.8
  L1_GND w0.15: J1.34@12.15,-5.375 v2(12.15,-4.825)
  L3_DC_B w0.125: v2(12.15,-4.825) 10.01,-2.685 10.01,38.935 13.13,42.055 13.13,43.827 v3(12.833,44.124)
DC27: J1.36 Q1.27 | length 52.7
  L1_GND w0.15: J1.36@12.75,-5.375 v2(12.75,-4.825)
  L3_DC_B w0.125: v2(12.75,-4.825) 10.27,-2.345 10.27,38.675 13.39,41.795 13.39,44.256 v3(12.856,44.79)
DC28: J1.48 R28.2 | length 52
  L1_GND w0.15: J1.48@16.35,-5.375 v2(16.35,-4.825)
  L3_DC_B w0.125: v4(15.352,40.472) 15.73,40.094 15.73,37.895 12.113,34.278 12.113,33.712 14.95,30.875 14.95,28.535 11.83,25.415 11.83,-0.629 12.046,-0.845 12.37,-0.845 v2(16.35,-4.825)
DC29: J1.38 Q1.29 | length 54.3
  L1_GND w0.15: J1.38@13.35,-5.375 v2(13.35,-4.825)
  L3_DC_B w0.125: v3(12.879,46.15) 13.65,45.379 13.65,41.535 10.53,38.415 10.53,-2.005 v2(13.35,-4.825)
DC30: J1.46 R24.2 | length 54.1
  L1_GND w0.15: J1.46@15.75,-5.375 v2(15.75,-4.825)
  L3_DC_B w0.125: v2(15.75,-4.825) 12.03,-1.105 11.754,-1.105 11.57,-0.921 11.57,25.675 14.69,28.795 14.69,30.615 11.57,33.735 11.57,37.895 15.765,42.09 v4(15.765,42.55)
DC31: J1.44 R21.2 | length 62.3
  L1_GND w0.15: J1.44@15.15,-5.375 v2(15.15,-4.825)
  L3_DC_B w0.125: v2(15.15,-4.825) 11.69,-1.365 11.462,-1.365 11.31,-1.213 11.31,25.935 14.43,29.055 14.43,30.355 11.31,33.475 11.31,38.155 14.17,41.015 14.17,44.915 16.51,47.255 16.51,49.599 16.254,49.855 15.87,49.855 v4(15.765,49.75)
DC32: J1.24 R30.2 | length 64.9
  L1_GND w0.15: J1.24@9.15,-5.375 v2(9.15,-4.825)
  L3_DC_B w0.125: v2(9.15,-4.825) 8.71,-4.385 8.71,41.535 7.811,42.434 7.811,42.716 8.19,43.095 11.83,43.095 12.35,43.615 12.35,49.075 12.09,49.335 12.09,50.235 12.49,50.635 15.21,50.635 15.47,50.895 15.47,51.71 v4(15.352,51.828)
DC33: J1.40 Q1.33 | length 58.3
  L1_GND w0.15: J1.40@13.95,-5.375 v2(13.95,-4.825)
  L3_DC_B w0.125: v3(12.714,49.718) 13.91,48.522 13.91,41.275 10.79,38.155 10.79,-1.797 10.878,-1.885 11.01,-1.885 v2(13.95,-4.825)
DC34: J1.23 R31.2 | length 90.6
  L1_GND w0.15: v2(8.85,-8.99) J1.23@8.85,-8.44
  L3_DC_B w0.125: v2(8.85,-8.99) 5.385,-5.525 2.21,-5.525 1.69,-5.005 1.69,-4.225 1.95,-3.965 7.52,-3.965 7.67,-3.815 7.67,24.895 4.29,28.275 4.29,31.135 6.89,33.735 6.89,41.015 5.59,42.315 5.59,50.375 9.75,54.535 9.75,58.555 10.15,58.955 14.43,58.955 15.472,57.913 v4(15.472,57.052)
DC35: J1.21 R32.2 | length 92.6
  L1_GND w0.15: v2(8.25,-8.99) J1.21@8.25,-8.44
  L3_DC_B w0.125: v2(8.25,-8.99) 5.045,-5.785 1.69,-5.785 1.43,-5.525 1.43,-3.965 1.69,-3.705 7.01,-3.705 7.41,-3.305 7.41,24.635 4.03,28.015 4.03,31.395 6.63,33.995 6.63,40.755 5.33,42.055 5.33,50.635 9.49,54.795 9.49,63.115 9.75,63.375 13.39,63.375 13.45,63.315 v4(13.45,62.6)
DC36: J1.25 Q1.36 | length 79.1
  L1_GND w0.15: v2(9.45,-8.99) J1.25@9.45,-8.44
  L3_DC_B w0.125: v2(9.45,-8.99) 5.725,-5.265 2.47,-5.265 2.158,-4.953 2.158,-4.537 2.47,-4.225 7.78,-4.225 7.93,-4.075 7.93,25.155 4.55,28.535 4.55,30.875 7.15,33.475 7.15,41.535 5.85,42.835 5.85,50.115 6.37,50.635 10.53,50.635 11.008,50.157 v3(11.008,49.766)
DC37: J1.20 Q1.37 | length 63.6
  L1_GND w0.15: J1.20@7.95,-5.375 v2(7.95,-4.825)
  L3_DC_B w0.125: v2(7.95,-4.825) 8.19,-4.585 8.19,25.675 4.81,29.055 4.81,30.355 7.67,33.215 7.67,41.535 6.11,43.095 6.11,49.855 6.63,50.375 10.27,50.375 10.499,50.146 v3(10.499,49.775)
DC38: J1.22 Q1.38 | length 60.8
  L1_GND w0.15: J1.22@8.55,-5.375 v2(8.55,-4.825)
  L3_DC_B w0.125: v2(8.55,-4.825) 8.45,-4.725 8.45,25.935 5.07,29.315 5.07,30.095 7.93,32.955 7.93,41.795 7.15,42.575 7.15,48.675 7.55,49.075 8.662,49.075 8.97,49.383 8.97,49.846 9.239,50.115 9.643,50.115 v3(9.977,49.781)